# Altium PCB NB3000XN.PcbDoc (part 6 of 71)
Units mil, origin at the board's own origin, x right, y up, seen from the top; angles counter-clockwise.
Board outline 9527.56 x 6929.77 mil, 6 copper layers (Top Layer, GND+SHIELD, MidLayer1, MidLayer2, P2 - 3V3+5V0, Bottom Layer), stack 62.375 mil thick; 832 components, 1027 nets, 4655 pads, 4981 vias.
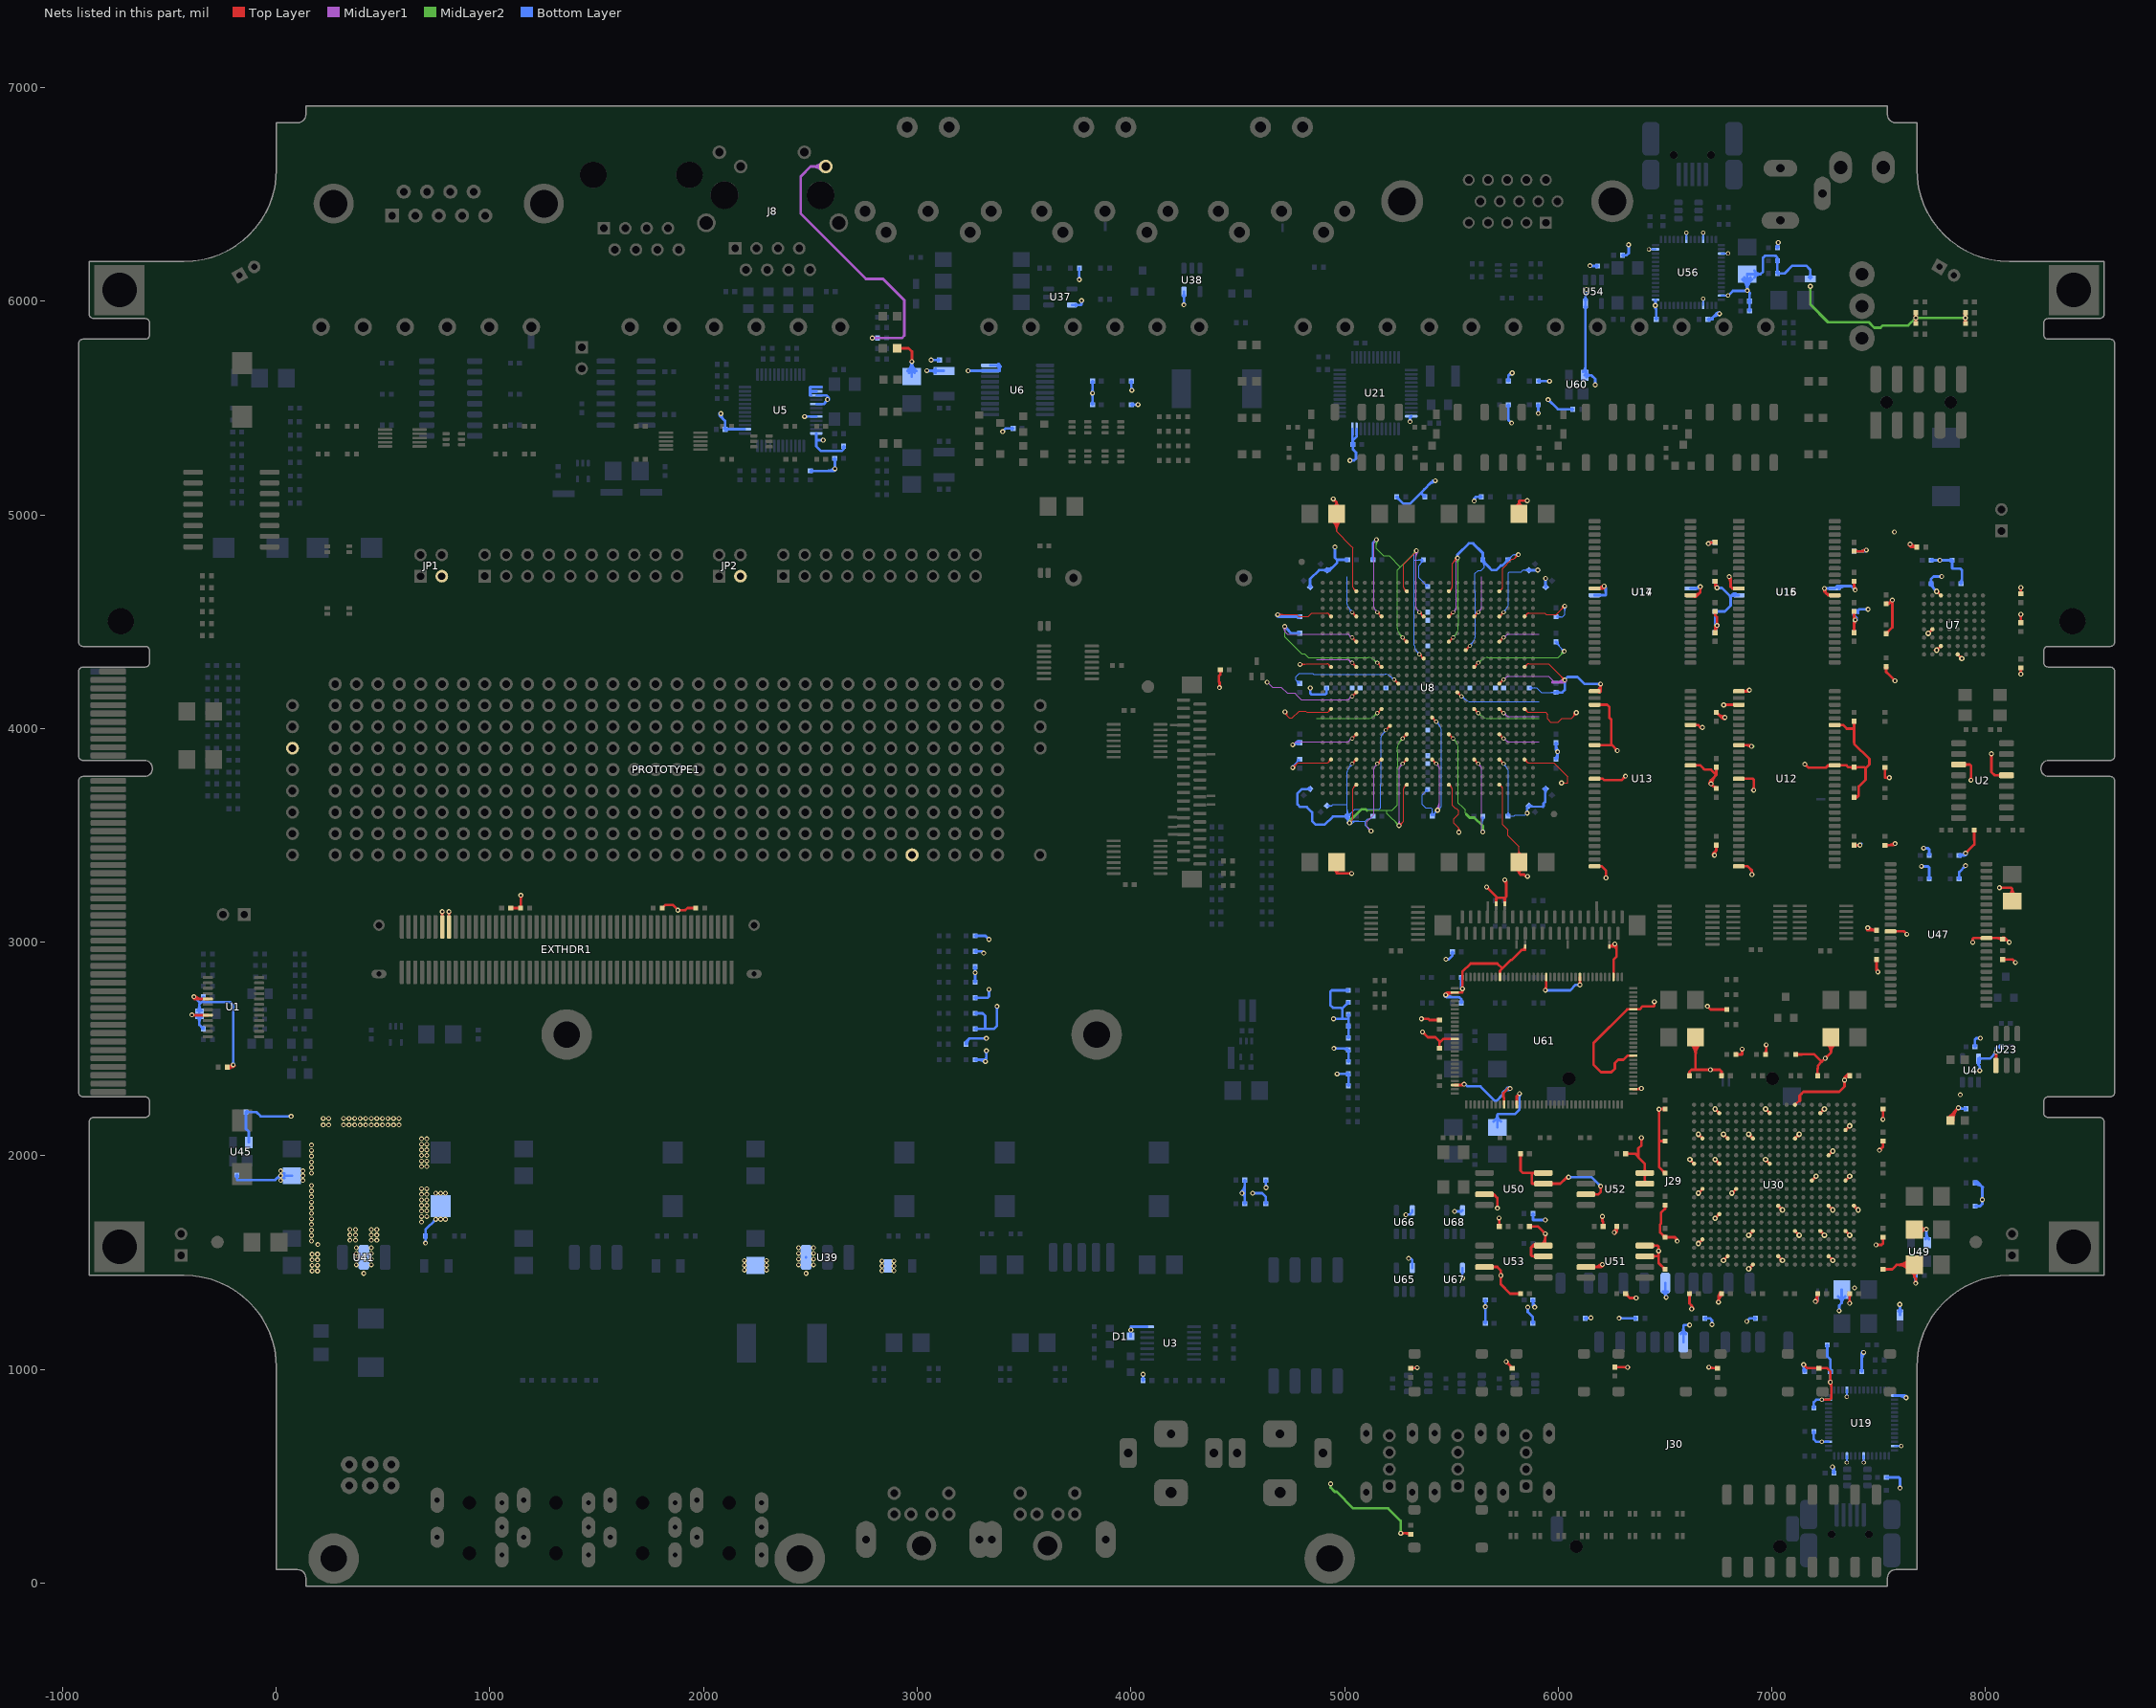
[diagram p10: the nets of this part, all layers, seen from the top]

## Via types
v1: diameter 23, hole 11.81, Top Layer to Bottom Layer, 3672 vias
v2: diameter 26, hole 11.81, Top Layer to Bottom Layer, 461 vias
v3: diameter 19, hole 11.81, Top Layer to Bottom Layer, tented both sides, 396 vias
v4: diameter 23.62, hole 11.81, Top Layer to Bottom Layer, 288 vias
v5: diameter 20, hole 11.81, Top Layer to Bottom Layer, 91 vias
v6: diameter 23, hole 11.81, Top Layer to Bottom Layer, tented both sides, 50 vias
v7: diameter 31, hole 11.81, Top Layer to Bottom Layer, 15 vias
v8: diameter 27.56, hole 11.81, Top Layer to Bottom Layer, tented both sides, 4 vias
v9: diameter 29, hole 11.81, Top Layer to Bottom Layer, 3 vias
v10: diameter 21, hole 11.81, Top Layer to Bottom Layer, 1 vias

## Nets (pads, with @x,y where several pads share a name; then routed paths per layer and width w, separated by ;. In a path a pad name is that pad's centre, name@x,y a point inside that pad or via, vN(x,y) a via of type N, cw(c..) or ccw(c..) an arc to the next point about the centre after c; other vN are vias at no path point) (continued)
3V3: C20.1 C21.1 C35.1 C36.1 C37.2 C39.2 C49.1 C50.2 C51.2 C52.2 C54.2 C55.1 C56.1 C57.1 C58.1 C59.1 C60.1 C63.1 C64.1 C65.1 C66.1 C67.1 C68.1 C69.1 C70.1 C71.1 C72.1 C73.1 C74.1 C75.1 C76.1 C77.1 C78.1 C79.1 C80.1 C81.1 C82.1 C83.1 C84.1 C85.1 C86.1 C90.2 C91.2 C92.2 C93.1 C94.1 C95.1 C96.1 C126.1 C127.1 C136.1 C137.1 C153.1 C154.1 C155.1 C156.1 C158.1 C159.2 C160.1 C161.2 C162.1 C163.2 C164.1 C165.2 C168.1 C172.2 C173.2 C174.2 C175.1 C176.1 C177.1 C185.1 C200.1 C201.1 C202.1 C203.1 C215.1 C216.1 C217.1 C218.1 C219.1 C220.1 C221.1 C222.1 C223.1 C224.1 C225.1 C226.1 C227.1 C228.1 C229.1 C231.1 C232.1 C233.1 C234.1 C235.1 C236.1 C237.1 C238.1 C239.1 C240.1 C241.1 C242.1 C243.1 C244.1 C245.1 C246.1 C247.1 C248.1 C249.1 C250.1 C251.1 C252.1 C253.1 C254.1 C255.1 C256.1 C257.1 C258.1 C259.1 C276.1 C277.1 C278.1 C279.1 C291.1 C292.1 C293.1 C294.1 C295.1 C296.1 C297.1 C298.1 C299.1 C300.1 C301.1 C302.1 C303.1 C304.1 C305.1 C307.1 C308.1 C309.1 C310.1 C311.1 C312.1 C313.1 C314.1 C315.1 C316.1 C317.1 C318.1 C319.1 C320.1 C321.1 C322.1 C323.1 C324.1 C325.1 C326.1 C327.1 C328.1 C329.1 C330.1 C331.1 C332.1 C333.1 C334.1 C335.1 D1.3 EXTHDR1.85 EXTHDR1.87 J8.12 J29.4 J30.4 JP1.3 JP2.3 L2.1 LED2.1 LED3.1 NT6.2 NT10.1 NT34.2 NT35.2 NT36.2 NT37.2 NT45.1 PROTOTYPE1.28 R21.1 R39.1 R50.2 R57.2 R59.2 R70.2 R73.2 R76.2 R77.2 R98.2 R99.2 R102.1 R103.1 R104.2 R105.1 R106.2 R107.1 R113.1 R114.1 R115.2 R131.2 R147.1 R154.2 R156.2 R158.2 R159.2 R161.1 R162.1 R195.2 R205.2 R215.1 R216.2 R217.2 R218.2 R219.2 R224.2 R225.2 R226.2 R227.2 R232.2 R234.2 R235.2 R236.2 R237.2 R238.2 R239.2 R240.2 R241.2 R242.2 R243.2 R248.2 R250.1 R251.1 R252.2 R253.1 R254.1 R255.1 R256.1 R260.2 R264.2 R265.2 R266.2 R271.2 R272.2 R273.2 R277.1 R278.2 R279.1 R280.1 R281.1 R282.1 R283.1 TP4.1 U1.5 U1.8 U2.3 U2.13 U3.14 U4.5 U5.14 U5.37 U5.38 U5.39 U5.41 U5.44 U5.48 U6.19 U6.20 U7.D8 U7.F1 U7.F7 U7.G5 U8.AB2 U8.AB5 U8.AB8 U8.AB11 U8.AB14 U8.AB19 U8.AB22 U8.AB25 U8.AE5 U8.AE11 U8.AE16 U8.AE22 U8.B5 U8.B11 U8.B16 U8.B22 U8.E2 U8.E5 U8.E8 U8.E13 U8.E16 U8.E19 U8.E22 U8.E25 U8.H5 U8.H11 U8.H16 U8.H22 U8.J18 U8.K13 U8.L2 U8.L5 U8.L8 U8.L19 U8.L25 U8.N10 U8.N22 U8.P5 U8.P17 U8.T2 U8.T8 U8.T19 U8.T22 U8.T25 U8.U14 U8.V9 U8.W5 U8.W11 U8.W16 U8.W22 U12.1 U12.3 U12.9 U12.14 U12.27 U12.43 U12.49 U13.1 U13.3 U13.9 U13.14 U13.27 U13.43 U13.49 U14.11 U14.33 U15.11 U15.33 U16.11 U16.33 U17.11 U17.33 U19.7 U19.11 U19.17 U19.27 U19.32 U19.43 U19.55 U21.12 U21.23 U21.24 U23.4 U30.A13 U30.B4 U30.B10 U30.B16 U30.D7 U30.D13 U30.D19 U30.E2 U30.E16 U30.F10 U30.H1 U30.H5 U30.H16 U30.K13 U30.K19 U30.L2 U30.L8 U30.N5 U30.N16 U30.N20 U30.R11 U30.T5 U30.T19 U30.U2 U30.U8 U30.U14 U30.W5 U30.W11 U30.W17 U30.Y8 U37.5 U38.5 U39.3 U41.2 U45.4 U47.11 U47.33 U49.4 U50.3 U50.7 U50.8 U51.3 U51.7 U51.8 U52.3 U52.7 U52.8 U53.3 U53.7 U53.8 U54.5 U56.7 U56.11 U56.17 U56.27 U56.32 U56.43 U56.55 U60.4 U61.10 U61.13 U61.40 U61.48 U61.59 U61.67 U61.75 U61.83 U61.94 U61.104 U61.115 U61.126 U65.5 U66.5 U67.5 U68.5 | length 76783.8
  Top Layer w4: R147.1@4415.19,4271.37 R147.1@4418.82,4275 ; v1(4686.86,4533.37) 4757,4533.37 4776.66,4533.37 4784.33,4525.71 4802.13,4525.71 4824,4525.71 4831.86,4525.71 4842.52,4536.37 4842.52,4536.49 4846.19,4540.15 4855.26,4540.15 4860,4540.15 4870,4540.15 4917.53,4540.15 ; v1@4690.75,4529.49 cw(c4700.14,4520.1) 4700.14,4533.37 cw(c4700.14,4546.65) v1@4690.75,4537.26 ; v1@4693.57,4526.66 cw(c4709.79,4510.44) 4709.79,4533.37 cw(c4709.79,4556.31) v1@4693.57,4540.09 ; v4(4721.3,4078.1) 4725,4074.4 4725,4065 4740.79,4049.21 4755.77,4049.21 4788.77,4082.21 4817.42,4082.21 4823.56,4076.07 4860,4076.07 4870,4076.07 4917.53,4076.07 ccw(c4917.53,4086.22) 4924.71,4079.04 ; v4@4723.03,4077.58 ccw(c4736.72,4073.49) 4726.62,4063.38 ; v4@4726.86,4076.44 ccw(c4744.01,4071.3) 4731.35,4058.65 ; v4@4730.7,4075.29 ccw(c4751.3,4069.12) 4736.09,4053.91 ; v1(4757.52,3816.71) 4780.66,3839.85 4860,3839.85 4870,3839.85 4917.53,3839.85 ; v1@4757.52,3822.21 ccw(c4757.52,3835.49) 4766.91,3826.1 ccw(c4776.3,3816.71) v1@4763.02,3816.71 ; v1@4757.52,3826.21 ccw(c4757.52,3849.14) 4773.74,3832.93 ccw(c4789.96,3816.71) v1@4767.02,3816.71 ; v1@4795.41,4296.15 cw(c4804.8,4286.76) 4804.8,4300.04 cw(c4804.8,4313.32) 4795.41,4303.93 v1(4791.52,4300.04) 4816.11,4300.04 4820,4303.93 4860,4303.93 4870,4303.93 4917.53,4303.93 cw(c4917.53,4293.78) 4924.71,4300.96 ; v1@4798.24,4293.32 cw(c4814.46,4277.11) 4814.46,4300.04 cw(c4814.46,4322.98) v1@4798.24,4306.76 ; U8.T2@4929.9,4091.57 cw(c4912.17,4091.57) 4924.71,4079.04 ; U8.L2@4929.9,4288.43 ccw(c4912.17,4288.43) 4924.71,4300.96 ; U8.T2@4937.24,4084.23 ccw(c4937.24,4066.51) 4924.71,4079.04 ; U8.L2@4937.24,4295.77 cw(c4937.24,4313.49) 4924.71,4300.96 ; C276.1@4939.62,4971.9 cw(c4900.61,4923.22) 4962.99,4923.22 ; C276.1@4942.12,4975.02 cw(c4907.29,4931.56) 4962.99,4931.56 cw(c5018.7,4931.56) C276.1@4983.86,4975.02 ; C276.1@4944.63,4978.14 cw(c4913.97,4939.89) 4962.99,4939.89 cw(c5012.02,4939.89) C276.1@4981.36,4978.14 ; C276.1@4947.13,4981.27 cw(c4920.64,4948.22) 4962.99,4948.22 cw(c5005.34,4948.22) C276.1@4978.86,4981.27 ; C276.1@4949.63,4984.39 cw(c4927.32,4956.55) 4962.99,4956.55 cw(c4998.66,4956.55) C276.1@4976.36,4984.39 ; C276.1@4962.99,4982.01 4962.99,4923.22 ; C276.1@4986.36,4971.9 ccw(c5025.37,4923.22) 4962.99,4923.22 ; v1(5023.52,3558.37) 5039.85,3574.7 5039.85,3655.26 5039.85,3660 5039.85,3670 5039.85,3717.53 ; v3(5035.67,3835.67) U8.AB5@5055.35,3855.35 ; v3(5035.67,3953.78) U8.W5@5055.35,3973.46 ; v3(5035.67,4150.63) U8.P5@5055.35,4170.31 ; v3(5035.67,4308.11) U8.L5@5055.35,4288.43 ; v3(5035.67,4426.22) U8.H5@5055.35,4406.54 ; v3(5035.67,4544.33) U8.E5@5055.35,4524.65 ; U8.AB5@5047.85,3855.35 cw(c5029.75,3855.35) 5042.55,3842.55 cw(c5055.35,3829.75) U8.AB5@5055.35,3847.85 ; U8.W5@5047.85,3973.46 cw(c5029.75,3973.46) 5042.55,3960.66 cw(c5055.35,3947.86) U8.W5@5055.35,3965.96 ; U8.P5@5047.85,4170.31 cw(c5029.75,4170.31) 5042.55,4157.51 cw(c5055.35,4144.71) U8.P5@5055.35,4162.81 ; U8.L5@5047.85,4288.43 ccw(c5029.75,4288.43) 5042.55,4301.23 ccw(c5055.35,4314.03) U8.L5@5055.35,4295.93 ; U8.H5@5047.85,4406.54 ccw(c5029.75,4406.54) 5042.55,4419.34 ccw(c5055.35,4432.14) U8.H5@5055.35,4414.04 ; U8.E5@5047.85,4524.65 ccw(c5029.75,4524.65) 5042.55,4537.45 ccw(c5055.35,4550.25) U8.E5@5055.35,4532.15 ; U8.AB5@5048.01,3855.35 cw(c5030.29,3855.35) 5042.82,3842.82 cw(c5055.35,3830.29) U8.AB5@5055.35,3848.01 ; U8.W5@5048.01,3973.46 cw(c5030.29,3973.46) 5042.82,3960.93 cw(c5055.35,3948.4) U8.W5@5055.35,3966.12 ; U8.P5@5048.01,4170.31 cw(c5030.29,4170.31) 5042.82,4157.78 cw(c5055.35,4145.25) U8.P5@5055.35,4162.97 ; U8.L5@5048.01,4288.43 ccw(c5030.29,4288.43) 5042.82,4300.96 ccw(c5055.35,4313.49) U8.L5@5055.35,4295.77 ; U8.H5@5048.01,4406.54 ccw(c5030.29,4406.54) 5042.82,4419.07 ccw(c5055.35,4431.6) U8.H5@5055.35,4413.88 ; U8.E5@5048.01,4524.65 ccw(c5030.29,4524.65) 5042.82,4537.18 ccw(c5055.35,4549.71) U8.E5@5055.35,4531.99 ; v3(5153.78,3835.67) U8.AB8@5173.46,3855.35 ; v3(5153.78,4071.89) U8.T8@5173.46,4091.57 ; v3(5153.78,4308.11) U8.L8@5173.46,4288.43 ; v3(5153.78,4544.33) U8.E8@5173.46,4524.65 ; U8.AB8@5165.96,3855.35 cw(c5147.86,3855.35) 5160.66,3842.55 cw(c5173.46,3829.75) U8.AB8@5173.46,3847.85 ; U8.T8@5165.96,4091.57 cw(c5147.86,4091.57) 5160.66,4078.77 cw(c5173.46,4065.97) U8.T8@5173.46,4084.07 ; U8.L8@5165.96,4288.43 ccw(c5147.86,4288.43) 5160.66,4301.23 ccw(c5173.46,4314.03) U8.L8@5173.46,4295.93 ; U8.E8@5165.96,4524.65 ccw(c5147.86,4524.65) 5160.66,4537.45 ccw(c5173.46,4550.25) U8.E8@5173.46,4532.15 ; U8.AB8@5166.12,3855.35 cw(c5148.4,3855.35) 5160.93,3842.82 cw(c5173.46,3830.29) U8.AB8@5173.46,3848.01 ; U8.T8@5166.12,4091.57 cw(c5148.4,4091.57) 5160.93,4079.04 cw(c5173.46,4066.51) U8.T8@5173.46,4084.23 ; U8.L8@5166.12,4288.43 ccw(c5148.4,4288.43) 5160.93,4300.96 ccw(c5173.46,4313.49) U8.L8@5173.46,4295.77 ; U8.E8@5166.12,4524.65 ccw(c5148.4,4524.65) 5160.93,4537.18 ccw(c5173.46,4549.71) U8.E8@5173.46,4531.99 ; v3(5193.15,3993.15) U8.V9@5212.83,4012.83 ; U8.V9@5205.33,4012.83 cw(c5187.23,4012.83) 5200.03,4000.03 cw(c5212.83,3987.23) U8.V9@5212.83,4005.33 ; U8.V9@5205.49,4012.83 cw(c5187.77,4012.83) 5200.3,4000.3 cw(c5212.83,3987.77) U8.V9@5212.83,4005.49 ; v3(5232.52,4229.37) U8.N10@5252.2,4209.69 ; U8.N10@5244.7,4209.69 ccw(c5226.6,4209.69) 5239.4,4222.49 ccw(c5252.2,4235.29) U8.N10@5252.2,4217.19 ; U8.N10@5244.86,4209.69 ccw(c5227.14,4209.69) 5239.67,4222.22 ccw(c5252.2,4234.75) U8.N10@5252.2,4217.03 ; v1(5255.52,3545.37) 5276.07,3565.92 5276.07,3660 ; v1@5255.52,3550.87 ccw(c5255.52,3564.15) 5264.91,3554.76 ccw(c5274.3,3545.37) v1@5261.02,3545.37 ; v1@5255.52,3554.87 ccw(c5255.52,3577.81) 5271.74,3561.59 ccw(c5287.96,3545.37) v1@5265.02,3545.37 ; v3(5271.89,3835.67) U8.AB11@5291.57,3855.35 ; v3(5271.89,3953.78) U8.W11@5291.57,3973.46 ; v3(5271.89,4426.22) U8.H11@5291.57,4406.54 ; 5276.07,3658.37 5276.07,3655.26 5276.07,3660 ; U8.AB11@5284.07,3855.35 cw(c5265.97,3855.35) 5278.77,3842.55 cw(c5291.57,3829.75) U8.AB11@5291.57,3847.85 ; U8.W11@5284.07,3973.46 cw(c5265.97,3973.46) 5278.77,3960.66 cw(c5291.57,3947.86) U8.W11@5291.57,3965.96 ; U8.H11@5284.07,4406.54 ccw(c5265.97,4406.54) 5278.77,4419.34 ccw(c5291.57,4432.14) U8.H11@5291.57,4414.04 ; U8.AE11@5284.23,3737.24 cw(c5266.51,3737.24) 5279.04,3724.71 ; U8.AB11@5284.23,3855.35 cw(c5266.51,3855.35) 5279.04,3842.82 cw(c5291.57,3830.29) U8.AB11@5291.57,3848.01 ; U8.W11@5284.23,3973.46 cw(c5266.51,3973.46) 5279.04,3960.93 cw(c5291.57,3948.4) U8.W11@5291.57,3966.12 ; U8.H11@5284.23,4406.54 ccw(c5266.51,4406.54) 5279.04,4419.07 ccw(c5291.57,4431.6) U8.H11@5291.57,4413.88 ; U8.B11@5284.23,4642.76 ccw(c5266.51,4642.76) 5279.04,4655.29 ; U8.AE11@5291.57,3729.9 ccw(c5291.57,3712.17) 5279.04,3724.71 ; U8.B11@5291.57,4650.1 cw(c5291.57,4667.83) 5279.04,4655.29 ; 5306.86,4800.65 5276.07,4769.86 5276.07,4724.74 5276.07,4720 5276.07,4710 5276.07,4662.47 ccw(c5286.22,4662.47) 5279.04,4655.29 ; 5306.86,4800.71 5339.52,4833.37 5337.54,4833.37 v1(5336.67,4832.5) ; v3(5350.63,4347.48) U8.K13@5370.31,4327.8 ; v3(5350.63,4544.33) U8.E13@5370.31,4524.65 ; U8.K13@5362.81,4327.8 ccw(c5344.71,4327.8) 5357.51,4340.6 ccw(c5370.31,4353.4) U8.K13@5370.31,4335.3 ; U8.E13@5362.81,4524.65 ccw(c5344.71,4524.65) 5357.51,4537.45 ccw(c5370.31,4550.25) U8.E13@5370.31,4532.15 ; U8.K13@5362.97,4327.8 ccw(c5345.25,4327.8) 5357.78,4340.33 ccw(c5370.31,4352.86) U8.K13@5370.31,4335.14 ; U8.E13@5362.97,4524.65 ccw(c5345.25,4524.65) 5357.78,4537.18 ccw(c5370.31,4549.71) U8.E13@5370.31,4531.99 ; U8.AB14@5409.69,3847.85 cw(c5409.69,3829.75) 5422.49,3842.55 cw(c5435.29,3855.35) U8.AB14@5417.19,3855.35 ; U8.AB14@5409.69,3848.01 cw(c5409.69,3830.29) 5422.22,3842.82 cw(c5434.75,3855.35) U8.AB14@5417.03,3855.35 ; U8.AB14@5409.69,3855.35 v3(5429.37,3835.67) ; U8.U14@5409.69,4044.7 cw(c5409.69,4026.6) 5422.49,4039.4 cw(c5435.29,4052.2) U8.U14@5417.19,4052.2 ; U8.U14@5409.69,4044.86 cw(c5409.69,4027.14) 5422.22,4039.67 cw(c5434.75,4052.2) U8.U14@5417.03,4052.2 ; U8.U14@5409.69,4052.2 v3(5429.37,4032.52) ; U8.AE16@5488.43,3729.9 cw(c5488.43,3712.17) 5500.96,3724.71 ; U8.W16@5488.43,3965.96 cw(c5488.43,3947.86) 5501.23,3960.66 cw(c5514.03,3973.46) U8.W16@5495.93,3973.46 ; U8.W16@5488.43,3966.12 cw(c5488.43,3948.4) 5500.96,3960.93 cw(c5513.49,3973.46) U8.W16@5495.77,3973.46 ; U8.W16@5488.43,3973.46 v3(5508.11,3953.78) ; U8.H16@5488.43,4406.54 v3(5508.11,4426.22) ; U8.H16@5488.43,4413.88 ccw(c5488.43,4431.6) 5500.96,4419.07 ccw(c5513.49,4406.54) U8.H16@5495.77,4406.54 ; U8.H16@5488.43,4414.04 ccw(c5488.43,4432.14) 5501.23,4419.34 ccw(c5514.03,4406.54) U8.H16@5495.93,4406.54 ; U8.E16@5488.43,4524.65 v3(5508.11,4544.33) ; U8.E16@5488.43,4531.99 ccw(c5488.43,4549.71) 5500.96,4537.18 ccw(c5513.49,4524.65) U8.E16@5495.77,4524.65 ; U8.E16@5488.43,4532.15 ccw(c5488.43,4550.25) 5501.23,4537.45 ccw(c5514.03,4524.65) U8.E16@5495.93,4524.65 ; U8.B16@5488.43,4650.1 ccw(c5488.43,4667.83) 5500.96,4655.29 ; U8.AE16@5495.77,3737.24 ccw(c5513.49,3737.24) 5500.96,3724.71 ; U8.B16@5495.77,4642.76 cw(c5513.49,4642.76) 5500.96,4655.29 ; v1@5519.36,4798.37 cw(c5496.42,4798.37) 5512.64,4782.16 cw(c5528.86,4765.94) v1@5528.86,4788.87 ; v1@5523.36,4798.37 cw(c5510.08,4798.37) 5519.47,4788.99 cw(c5528.86,4779.6) v1@5528.86,4792.87 ; U8.P17@5527.8,4162.81 cw(c5527.8,4144.71) 5540.6,4157.51 cw(c5553.4,4170.31) U8.P17@5535.3,4170.31 ; U8.P17@5527.8,4162.97 cw(c5527.8,4145.25) 5540.33,4157.78 cw(c5552.86,4170.31) U8.P17@5535.14,4170.31 ; U8.P17@5527.8,4170.31 v3(5547.48,4150.63) ; v1(5528.86,4798.37) 5503.93,4773.45 5503.93,4724.74 5503.93,4720 5503.93,4710 5503.93,4662.47 cw(c5493.78,4662.47) 5500.96,4655.29 ; v4@5529,3522.76 ccw(c5519.52,3535) 5535,3535 ccw(c5550.48,3535) v4@5541,3522.76 ; v4@5531.44,3519.6 ccw(c5525.83,3526.85) 5535,3526.85 ccw(c5544.17,3526.85) v4@5538.56,3519.6 ; v4(5535,3515) 5535,3535 5512.5,3557.5 5512.5,3576.7 5535.17,3599.37 5535.17,3614.58 5522.25,3627.5 5517.5,3627.5 5503.93,3641.07 5503.93,3660 5503.93,3670 5503.93,3717.53 ccw(c5493.78,3717.53) 5500.96,3724.71 ; U8.J18@5567.17,4367.17 v3(5586.85,4386.85) ; U8.J18@5567.17,4374.51 ccw(c5567.17,4392.23) 5579.7,4379.7 ccw(c5592.23,4367.17) U8.J18@5574.51,4367.17 ; U8.J18@5567.17,4374.67 ccw(c5567.17,4392.77) 5579.97,4379.97 ccw(c5592.77,4367.17) U8.J18@5574.67,4367.17 ; U8.AB19@5606.54,3847.85 cw(c5606.54,3829.75) 5619.34,3842.55 cw(c5632.14,3855.35) U8.AB19@5614.04,3855.35 ; U8.AB19@5606.54,3848.01 cw(c5606.54,3830.29) 5619.07,3842.82 cw(c5631.6,3855.35) U8.AB19@5613.88,3855.35 ; U8.AB19@5606.54,3855.35 v3(5626.22,3835.67) ; U8.T19@5606.54,4084.07 cw(c5606.54,4065.97) 5619.34,4078.77 cw(c5632.14,4091.57) U8.T19@5614.04,4091.57 ; U8.T19@5606.54,4084.23 cw(c5606.54,4066.51) 5619.07,4079.04 cw(c5631.6,4091.57) U8.T19@5613.88,4091.57 ; U8.T19@5606.54,4091.57 v3(5626.22,4071.89) ; U8.L19@5606.54,4288.43 v3(5626.22,4308.11) ; U8.L19@5606.54,4295.77 ccw(c5606.54,4313.49) 5619.07,4300.96 ccw(c5631.6,4288.43) U8.L19@5613.88,4288.43 ; U8.L19@5606.54,4295.93 ccw(c5606.54,4314.03) 5619.34,4301.23 ccw(c5632.14,4288.43) U8.L19@5614.04,4288.43 ; U8.E19@5606.54,4524.65 v3(5626.22,4544.33) ; U8.E19@5606.54,4531.99 ccw(c5606.54,4549.71) 5619.07,4537.18 ccw(c5631.6,4524.65) U8.E19@5613.88,4524.65 ; U8.E19@5606.54,4532.15 ccw(c5606.54,4550.25) 5619.34,4537.45 ccw(c5632.14,4524.65) U8.E19@5614.04,4524.65 ; U8.AB22@5724.65,3847.85 cw(c5724.65,3829.75) 5737.45,3842.55 cw(c5750.25,3855.35) U8.AB22@5732.15,3855.35 ; U8.AB22@5724.65,3848.01 cw(c5724.65,3830.29) 5737.18,3842.82 cw(c5749.71,3855.35) U8.AB22@5731.99,3855.35 ; U8.AB22@5724.65,3855.35 v3(5744.33,3835.67) ; U8.W22@5724.65,3965.96 cw(c5724.65,3947.86) 5737.45,3960.66 cw(c5750.25,3973.46) U8.W22@5732.15,3973.46 ; U8.W22@5724.65,3966.12 cw(c5724.65,3948.4) 5737.18,3960.93 cw(c5749.71,3973.46) U8.W22@5731.99,3973.46 ; U8.W22@5724.65,3973.46 v3(5744.33,3953.78) ; U8.T22@5724.65,4084.07 cw(c5724.65,4065.97) 5737.45,4078.77 cw(c5750.25,4091.57) U8.T22@5732.15,4091.57 ; U8.T22@5724.65,4084.23 cw(c5724.65,4066.51) 5737.18,4079.04 cw(c5749.71,4091.57) U8.T22@5731.99,4091.57 ; U8.T22@5724.65,4091.57 v3(5744.33,4071.89) ; U8.N22@5724.65,4209.69 v3(5744.33,4229.37) ; U8.N22@5724.65,4217.03 ccw(c5724.65,4234.75) 5737.18,4222.22 ccw(c5749.71,4209.69) U8.N22@5731.99,4209.69 ; U8.N22@5724.65,4217.19 ccw(c5724.65,4235.29) 5737.45,4222.49 ccw(c5750.25,4209.69) U8.N22@5732.15,4209.69 ; U8.H22@5724.65,4406.54 v3(5744.33,4426.22) ; U8.H22@5724.65,4413.88 ccw(c5724.65,4431.6) 5737.18,4419.07 ccw(c5749.71,4406.54) U8.H22@5731.99,4406.54 ; U8.H22@5724.65,4414.04 ccw(c5724.65,4432.14) 5737.45,4419.34 ccw(c5750.25,4406.54) U8.H22@5732.15,4406.54 ; U8.E22@5724.65,4524.65 v3(5744.33,4544.33) ; U8.E22@5724.65,4531.99 ccw(c5724.65,4549.71) 5737.18,4537.18 ccw(c5749.71,4524.65) U8.E22@5731.99,4524.65 ; U8.E22@5724.65,4532.15 ccw(c5724.65,4550.25) 5737.45,4537.45 ccw(c5750.25,4524.65) U8.E22@5732.15,4524.65 ; 5748.52,3541.71 5749.11,3541.12 ; v1@5804.02,4814.37 cw(c5781.09,4814.37) 5797.31,4798.16 cw(c5813.52,4781.94) v1@5813.52,4804.87 ; v1@5808.02,4814.37 cw(c5794.75,4814.37) 5804.14,4804.99 cw(c5813.52,4795.6) v1@5813.52,4808.87 ; C279.1@5809.31,3415.5 ccw(c5807.31,3425) 5817.01,3425 ccw(c5826.71,3425) C279.1@5824.71,3415.5 ; C279.1@5810.13,3411.59 ccw(c5808.34,3420.07) 5817.01,3420.07 ccw(c5825.67,3420.07) C279.1@5823.89,3411.59 ; v1(5813.52,4814.37) 5792.16,4793.01 5783.76,4793.01 5740.15,4749.4 5740.15,4737.37 5740.15,4735 5740.15,4724.74 5740.15,4720 5740.15,4710 5740.15,4662.47 ; C279.1@5817.01,3375 5817.01,3447.22 5765.19,3499.04 5765.19,3525.04 5749.11,3541.12 ; U8.T25@5842.76,4084.23 cw(c5842.76,4066.51) 5855.29,4079.04 ; U8.L25@5842.76,4295.77 ccw(c5842.76,4313.49) 5855.29,4300.96 ; v1@5848.52,3308.37 v1(5856.86,3308.37) ; U8.T25@5850.1,4091.57 ccw(c5867.83,4091.57) 5855.29,4079.04 ; U8.L25@5850.1,4288.43 cw(c5867.83,4288.43) 5855.29,4300.96 ; v4(6015,3745) 6015.87,3745.87 6045.19,3745.87 6045.19,3774.1 5979.44,3839.85 5920,3839.85 5910,3839.85 5862.47,3839.85 ; v1@6021.02,4227.71 ccw(c5998.09,4227.71) 6014.31,4243.93 ccw(c6030.52,4260.14) v1@6030.52,4237.21 ; v1@6021.02,4573.71 cw(c5998.09,4573.71) 6014.31,4557.49 cw(c6030.52,4541.27) v1@6030.52,4564.21 ; v1@6025.02,4227.71 ccw(c6011.75,4227.71) 6021.14,4237.1 ccw(c6030.52,4246.49) v1@6030.52,4233.21 ; v1@6025.02,4573.71 cw(c6011.75,4573.71) 6021.13,4564.32 cw(c6030.52,4554.93) v1@6030.52,4568.21 ; v1(6030.52,4227.71) 5958.19,4300.04 5954.3,4303.93 5931.86,4303.93 5920,4303.93 5910,4303.93 5862.47,4303.93 ccw(c5862.47,4293.78) 5855.29,4300.96 ; v1(6030.52,4573.71) 5990.19,4533.37 5945,4533.37 5938.22,4540.15 5923.52,4540.15 ; 6065,4050 ccw(c6040.4,4074.6) v4@6075.19,4074.91 ; 6071.74,4056.74 ccw(c6053.77,4074.72) v4@6079.19,4074.95 ; 6076.79,4061.79 cw(c6085,4053.57) v4@6085,4065.19 ; 6078.49,4063.49 ccw(c6067.13,4074.84) v4@6083.19,4074.98 ; v4(6085,4075) 6085,4070 6062.5,4047.5 6017,4047.5 5999.5,4030 5965,4030 5950.36,4044.64 5950.36,4066.53 5940.82,4076.07 5920,4076.07 5910,4076.07 5862.47,4076.07 cw(c5862.47,4086.22) 5855.29,4079.04 ; 4917.53,3839.85 ccw(c4917.53,3850) 4924.71,3842.82 ; 4917.53,3839.85 ccw(c4917.53,3850) 4924.71,3842.82 ; 4917.53,4540.15 cw(c4917.53,4530) 4924.71,4537.18 ; 4917.53,4540.15 cw(c4917.53,4530) 4924.71,4537.18 ; 4924.71,3842.82 ccw(c4912.17,3855.35) 4929.9,3855.35 cw(c4912.17,3855.35) 4924.71,3842.82 ; 4924.71,3842.82 cw(c4937.24,3830.29) 4937.24,3848.01 ccw(c4937.24,3830.29) 4924.71,3842.82 ; 4924.71,4537.18 cw(c4912.17,4524.65) 4929.9,4524.65 ccw(c4912.17,4524.65) 4924.71,4537.18 ; 4924.71,4537.18 ccw(c4937.24,4549.71) 4937.24,4531.99 cw(c4937.24,4549.71) 4924.71,4537.18 ; 4962.99,4923.22 5026.84,4859.37 5028.96,4857.25 ; 5028.96,4857.25 5031.25,4854.96 5039.85,4846.37 ; 5028.96,4857.25 5039.85,4846.37 ; 5039.85,3717.53 cw(c5050,3717.53) 5042.82,3724.71 ; 5039.85,3717.53 cw(c5050,3717.53) 5042.82,3724.71 ; 5039.85,4662.47 ccw(c5050,4662.47) 5042.82,4655.29 ; 5039.85,4662.47 ccw(c5050,4662.47) 5042.82,4655.29 ; 5039.85,4662.47 5039.85,4710 5039.85,4720 5039.85,4724.74 5039.85,4768 5039.85,4775.15 5039.85,4846.37 ; 5042.82,3724.71 cw(c5055.35,3712.17) 5055.35,3729.9 ccw(c5055.35,3712.17) 5042.82,3724.71 ; 5042.82,3724.71 ccw(c5030.29,3737.24) 5048.01,3737.24 cw(c5030.29,3737.24) 5042.82,3724.71 ; 5042.82,4655.29 ccw(c5055.35,4667.83) 5055.35,4650.1 cw(c5055.35,4667.83) 5042.82,4655.29 ; 5042.82,4655.29 cw(c5030.29,4642.76) 5048.01,4642.76 ccw(c5030.29,4642.76) 5042.82,4655.29 ; 5048.47,3848.47 cw(c5035.67,3861.28) 5035.67,3843.17 ccw(c5035.67,3861.28) 5048.47,3848.47 ; 5048.47,3848.47 ccw(c5061.28,3835.67) 5043.17,3835.67 cw(c5061.28,3835.67) 5048.47,3848.47 ; 5048.47,3966.58 cw(c5035.67,3979.39) 5035.67,3961.28 ccw(c5035.67,3979.39) 5048.47,3966.58 ; 5048.47,3966.58 ccw(c5061.28,3953.78) 5043.17,3953.78 cw(c5061.28,3953.78) 5048.47,3966.58 ; 5048.47,4163.43 cw(c5035.67,4176.24) 5035.67,4158.13 ccw(c5035.67,4176.24) 5048.47,4163.43 ; 5048.47,4163.43 ccw(c5061.28,4150.63) 5043.17,4150.63 cw(c5061.28,4150.63) 5048.47,4163.43 ; 5048.47,4295.31 ccw(c5035.67,4282.5) 5035.67,4300.61 cw(c5035.67,4282.5) 5048.47,4295.31 ; 5048.47,4295.31 cw(c5061.28,4308.11) 5043.17,4308.11 ccw(c5061.28,4308.11) 5048.47,4295.31 ; 5048.47,4413.42 ccw(c5035.67,4400.61) 5035.67,4418.72 cw(c5035.67,4400.61) 5048.47,4413.42 ; 5048.47,4413.42 cw(c5061.28,4426.22) 5043.17,4426.22 ccw(c5061.28,4426.22) 5048.47,4413.42 ; 5048.47,4531.53 ccw(c5035.67,4518.72) 5035.67,4536.83 cw(c5035.67,4518.72) 5048.47,4531.53 ; 5048.47,4531.53 cw(c5061.28,4544.33) 5043.17,4544.33 ccw(c5061.28,4544.33) 5048.47,4531.53 ; 5166.58,3848.47 cw(c5153.78,3861.28) 5153.78,3843.17 ccw(c5153.78,3861.28) 5166.58,3848.47 ; 5166.58,3848.47 ccw(c5179.39,3835.67) 5161.28,3835.67 cw(c5179.39,3835.67) 5166.58,3848.47 ; 5166.58,4084.69 cw(c5153.78,4097.5) 5153.78,4079.39 ccw(c5153.78,4097.5) 5166.58,4084.69 ; 5166.58,4084.69 ccw(c5179.39,4071.89) 5161.28,4071.89 cw(c5179.39,4071.89) 5166.58,4084.69 ; 5166.58,4295.31 cw(c5179.39,4308.11) 5161.28,4308.11 ccw(c5179.39,4308.11) 5166.58,4295.31 ; 5166.58,4295.31 ccw(c5153.78,4282.5) 5153.78,4300.61 cw(c5153.78,4282.5) 5166.58,4295.31 ; 5166.58,4531.53 cw(c5179.39,4544.33) 5161.28,4544.33 ccw(c5179.39,4544.33) 5166.58,4531.53 ; 5166.58,4531.53 ccw(c5153.78,4518.72) 5153.78,4536.83 cw(c5153.78,4518.72) 5166.58,4531.53 ; 5205.95,4005.95 cw(c5193.15,4018.76) 5193.15,4000.65 ccw(c5193.15,4018.76) 5205.95,4005.95 ; 5205.95,4005.95 ccw(c5218.76,3993.15) 5200.65,3993.15 cw(c5218.76,3993.15) 5205.95,4005.95 ; 5245.32,4216.57 cw(c5258.13,4229.37) 5240.02,4229.37 ccw(c5258.13,4229.37) 5245.32,4216.57 ; 5245.32,4216.57 ccw(c5232.52,4203.76) 5232.52,4221.87 cw(c5232.52,4203.76) 5245.32,4216.57 ; 5276.07,3660 5276.07,3670 5276.07,3717.53 cw(c5286.22,3717.53) 5279.04,3724.71 ; 5284.69,3848.47 cw(c5271.89,3861.28) 5271.89,3843.17 ccw(c5271.89,3861.28) 5284.69,3848.47 ; 5284.69,3848.47 ccw(c5297.5,3835.67) 5279.39,3835.67 cw(c5297.5,3835.67) 5284.69,3848.47 ; 5284.69,3966.58 ccw(c5297.5,3953.78) 5279.39,3953.78 cw(c5297.5,3953.78) 5284.69,3966.58 ; 5284.69,3966.58 cw(c5271.89,3979.39) 5271.89,3961.28 ccw(c5271.89,3979.39) 5284.69,3966.58 ; 5284.69,4413.42 cw(c5297.5,4426.22) 5279.39,4426.22 ccw(c5297.5,4426.22) 5284.69,4413.42 ; 5284.69,4413.42 ccw(c5271.89,4400.61) 5271.89,4418.72 cw(c5271.89,4400.61) 5284.69,4413.42 ; 5363.43,4334.68 cw(c5376.24,4347.48) 5358.13,4347.48 ccw(c5376.24,4347.48) 5363.43,4334.68 ; 5363.43,4334.68 ccw(c5350.63,4321.87) 5350.63,4339.98 cw(c5350.63,4321.87) 5363.43,4334.68 ; 5363.43,4531.53 cw(c5376.24,4544.33) 5358.13,4544.33 ccw(c5376.24,4544.33) 5363.43,4531.53 ; 5363.43,4531.53 ccw(c5350.63,4518.72) 5350.63,4536.83 cw(c5350.63,4518.72) 5363.43,4531.53 ; 5416.57,3848.47 cw(c5403.76,3835.67) 5421.87,3835.67 ccw(c5403.76,3835.67) 5416.57,3848.47 ; 5416.57,3848.47 ccw(c5429.37,3861.28) 5429.37,3843.17 cw(c5429.37,3861.28) 5416.57,3848.47 ; 5416.57,4045.32 cw(c5403.76,4032.52) 5421.87,4032.52 ccw(c5403.76,4032.52) 5416.57,4045.32 ; 5416.57,4045.32 ccw(c5429.37,4058.13) 5429.37,4040.02 cw(c5429.37,4058.13) 5416.57,4045.32 ; 5495.31,3966.58 cw(c5482.5,3953.78) 5500.61,3953.78 ccw(c5482.5,3953.78) 5495.31,3966.58 ; 5495.31,3966.58 ccw(c5508.11,3979.39) 5508.11,3961.28 cw(c5508.11,3979.39) 5495.31,3966.58 ; 5495.31,4413.42 cw(c5508.11,4400.61) 5508.11,4418.72 ccw(c5508.11,4400.61) 5495.31,4413.42 ; 5495.31,4413.42 ccw(c5482.5,4426.22) 5500.61,4426.22 cw(c5482.5,4426.22) 5495.31,4413.42 ; 5495.31,4531.53 cw(c5508.11,4518.72) 5508.11,4536.83 ccw(c5508.11,4518.72) 5495.31,4531.53 ; 5495.31,4531.53 ccw(c5482.5,4544.33) 5500.61,4544.33 cw(c5482.5,4544.33) 5495.31,4531.53 ; 5534.68,4163.43 cw(c5521.87,4150.63) 5539.98,4150.63 ccw(c5521.87,4150.63) 5534.68,4163.43 ; 5534.68,4163.43 ccw(c5547.48,4176.24) 5547.48,4158.13 cw(c5547.48,4176.24) 5534.68,4163.43 ; 5574.05,4374.05 cw(c5586.85,4361.24) 5586.85,4379.35 ccw(c5586.85,4361.24) 5574.05,4374.05 ; 5574.05,4374.05 ccw(c5561.24,4386.85) 5579.35,4386.85 cw(c5561.24,4386.85) 5574.05,4374.05 ; 5613.42,3848.47 cw(c5600.61,3835.67) 5618.72,3835.67 ccw(c5600.61,3835.67) 5613.42,3848.47 ; 5613.42,3848.47 ccw(c5626.22,3861.28) 5626.22,3843.17 cw(c5626.22,3861.28) 5613.42,3848.47 ; 5613.42,4084.69 cw(c5600.61,4071.89) 5618.72,4071.89 ccw(c5600.61,4071.89) 5613.42,4084.69 ; 5613.42,4084.69 ccw(c5626.22,4097.5) 5626.22,4079.39 cw(c5626.22,4097.5) 5613.42,4084.69 ; 5613.42,4295.31 cw(c5626.22,4282.5) 5626.22,4300.61 ccw(c5626.22,4282.5) 5613.42,4295.31 ; 5613.42,4295.31 ccw(c5600.61,4308.11) 5618.72,4308.11 cw(c5600.61,4308.11) 5613.42,4295.31 ; 5613.42,4531.53 cw(c5626.22,4518.72) 5626.22,4536.83 ccw(c5626.22,4518.72) 5613.42,4531.53 ; 5613.42,4531.53 ccw(c5600.61,4544.33) 5618.72,4544.33 cw(c5600.61,4544.33) 5613.42,4531.53 ; 5731.53,3848.47 cw(c5718.72,3835.67) 5736.83,3835.67 ccw(c5718.72,3835.67) 5731.53,3848.47 ; 5731.53,3848.47 ccw(c5744.33,3861.28) 5744.33,3843.17 cw(c5744.33,3861.28) 5731.53,3848.47 ; 5731.53,3966.58 cw(c5718.72,3953.78) 5736.83,3953.78 ccw(c5718.72,3953.78) 5731.53,3966.58 ; 5731.53,3966.58 ccw(c5744.33,3979.39) 5744.33,3961.28 cw(c5744.33,3979.39) 5731.53,3966.58 ; 5731.53,4084.69 cw(c5718.72,4071.89) 5736.83,4071.89 ccw(c5718.72,4071.89) 5731.53,4084.69 ; 5731.53,4084.69 ccw(c5744.33,4097.5) 5744.33,4079.39 cw(c5744.33,4097.5) 5731.53,4084.69 ; 5731.53,4216.57 cw(c5744.33,4203.76) 5744.33,4221.87 ccw(c5744.33,4203.76) 5731.53,4216.57 ; 5731.53,4216.57 ccw(c5718.72,4229.37) 5736.83,4229.37 cw(c5718.72,4229.37) 5731.53,4216.57 ; 5731.53,4413.42 cw(c5744.33,4400.61) 5744.33,4418.72 ccw(c5744.33,4400.61) 5731.53,4413.42 ; 5731.53,4413.42 ccw(c5718.72,4426.22) 5736.83,4426.22 cw(c5718.72,4426.22) 5731.53,4413.42 ; 5731.53,4531.53 cw(c5744.33,4518.72) 5744.33,4536.83 ccw(c5744.33,4518.72) 5731.53,4531.53 ; 5731.53,4531.53 ccw(c5718.72,4544.33) 5736.83,4544.33 cw(c5718.72,4544.33) 5731.53,4531.53 ; 5737.18,3724.71 cw(c5730,3717.53) 5740.15,3717.53 ; 5737.18,3724.71 cw(c5730,3717.53) 5740.15,3717.53 ; 5737.18,3724.71 ccw(c5724.65,3712.17) 5724.65,3729.9 cw(c5724.65,3712.17) 5737.18,3724.71 ; 5737.18,3724.71 cw(c5749.71,3737.24) 5731.99,3737.24 ccw(c5749.71,3737.24) 5737.18,3724.71 ; 5737.18,4655.29 ccw(c5730,4662.47) 5740.15,4662.47 ; 5737.18,4655.29 ccw(c5730,4662.47) 5740.15,4662.47 ; 5737.18,4655.29 cw(c5724.65,4667.83) 5724.65,4650.1 ccw(c5724.65,4667.83) 5737.18,4655.29 ; 5737.18,4655.29 ccw(c5749.71,4642.76) 5731.99,4642.76 cw(c5749.71,4642.76) 5737.18,4655.29 ; 5740.15,3717.53 5740.15,3670 5740.15,3660 5740.15,3636 5740.15,3628.41 5740.15,3550.08 5740.19,3550.04 5744.12,3546.11 5749.11,3541.12 ; 5855.29,3842.82 ccw(c5862.47,3850) 5862.47,3839.85 ; 5855.29,3842.82 ccw(c5862.47,3850) 5862.47,3839.85 ; 5855.29,3842.82 cw(c5867.83,3855.35) 5850.1,3855.35 ccw(c5867.83,3855.35) 5855.29,3842.82 ; 5855.29,3842.82 ccw(c5842.76,3830.29) 5842.76,3848.01 cw(c5842.76,3830.29) 5855.29,3842.82 ; 5855.29,4537.18 cw(c5862.47,4530) 5862.47,4540.15 ; 5855.29,4537.18 cw(c5862.47,4530) 5862.47,4540.15 ; 5855.29,4537.18 ccw(c5867.83,4524.65) 5850.1,4524.65 cw(c5867.83,4524.65) 5855.29,4537.18 ; 5855.29,4537.18 cw(c5842.76,4549.71) 5842.76,4531.99 ccw(c5842.76,4549.71) 5855.29,4537.18 ; 5862.47,4540.15 5910,4540.15 5920,4540.15 5923.52,4540.15 ; 5923.52,4540.15 5924.74,4540.15 5923.52,4540.15
  Top Layer w8: v2@6616.3,1974.11 cw(c6616.3,1952.38) 6631.66,1967.75 cw(c6647.03,1983.11) v2@6625.3,1983.11 ; v2(6616.3,1983.11) U30.Y8@6635.98,1963.43 ; U30.Y8@6630.14,1963.43 ccw(c6616.04,1963.43) 6626.01,1973.4 ccw(c6635.98,1983.37) U30.Y8@6635.98,1969.27 ; v2(6655.67,1589.41) U30.W17@6675.35,1609.09 ; v2@6655.67,1598.41 ccw(c6655.67,1620.14) 6671.03,1604.77 ccw(c6686.4,1589.41) v2@6664.67,1589.41 ; v2(6655.67,1825.63) U30.W11@6675.35,1845.31 ; v2@6655.67,1834.63 ccw(c6655.67,1856.36) 6671.03,1840.99 ccw(c6686.4,1825.63) v2@6664.67,1825.63 ; v2@6655.67,2092.22 cw(c6655.67,2070.49) 6671.03,2085.86 cw(c6686.4,2101.22) v2@6664.67,2101.22 ; v2(6655.67,2101.22) U30.W5@6675.35,2081.54 ; U30.W17@6669.51,1609.09 cw(c6655.41,1609.09) 6665.38,1599.12 cw(c6675.35,1589.15) U30.W17@6675.35,1603.25 ; U30.W11@6669.51,1845.31 cw(c6655.41,1845.31) 6665.38,1835.34 cw(c6675.35,1825.37) U30.W11@6675.35,1839.47 ; U30.W5@6669.51,2081.54 ccw(c6655.41,2081.54) 6665.38,2091.51 ccw(c6675.35,2101.48) U30.W5@6675.35,2087.38 ; v2(6734.41,1707.52) U30.U14@6754.09,1727.2 ; v2@6734.41,1716.52 ccw(c6734.41,1738.25) 6749.77,1722.88 ccw(c6765.14,1707.52) v2@6743.41,1707.52 ; v2@6734.41,1974.11 cw(c6734.41,1952.38) 6749.77,1967.75 cw(c6765.14,1983.11) v2@6743.41,1983.11 ; v2(6734.41,1983.11) U30.U8@6754.09,1963.43 ; v2@6734.41,2210.33 cw(c6734.41,2188.6) 6749.77,2203.97 cw(c6765.14,2219.33) v2@6743.41,2219.33 ; v2(6734.41,2219.33) U30.U2@6754.09,2199.65 ; U30.U14@6748.25,1727.2 cw(c6734.15,1727.2) 6744.12,1717.23 cw(c6754.09,1707.26) U30.U14@6754.09,1721.36 ; U30.U8@6748.25,1963.43 ccw(c6734.15,1963.43) 6744.12,1973.4 ccw(c6754.09,1983.37) U30.U8@6754.09,1969.27 ; U30.U2@6748.25,2199.65 ccw(c6734.15,2199.65) 6744.12,2209.62 ccw(c6754.09,2219.59) U30.U2@6754.09,2205.49 ; v2(6773.78,1510.67) U30.T19@6793.46,1530.35 ; v2@6773.78,1519.67 ccw(c6773.78,1541.4) 6789.14,1526.03 ccw(c6804.51,1510.67) v2@6782.78,1510.67 ; v2@6773.78,2092.22 cw(c6773.78,2070.49) 6789.14,2085.86 cw(c6804.51,2101.22) v2@6782.78,2101.22 ; v2(6773.78,2101.22) U30.T5@6793.46,2081.54 ; U30.T19@6787.62,1530.35 cw(c6773.52,1530.35) 6783.49,1520.38 cw(c6793.46,1510.41) U30.T19@6793.46,1524.51 ; U30.T5@6787.62,2081.54 ccw(c6773.52,2081.54) 6783.49,2091.51 ccw(c6793.46,2101.48) U30.T5@6793.46,2087.38 ; v2(6813.15,1825.63) U30.R11@6832.83,1845.31 ; v2@6813.15,1834.63 ccw(c6813.15,1856.36) 6828.51,1840.99 ccw(c6843.88,1825.63) v2@6822.15,1825.63 ; U30.R11@6826.99,1845.31 cw(c6812.89,1845.31) 6822.86,1835.34 cw(c6832.83,1825.37) U30.R11@6832.83,1839.47 ; v2(6891.89,1471.3) U30.N20@6911.57,1490.98 ; v2@6891.89,1480.3 ccw(c6891.89,1502.03) 6907.25,1486.66 ccw(c6922.62,1471.3) v2@6900.89,1471.3 ; v2(6891.89,1628.78) U30.N16@6911.57,1648.46 ; v2@6891.89,1637.78 ccw(c6891.89,1659.51) 6907.25,1644.14 ccw(c6922.62,1628.78) v2@6900.89,1628.78 ; v2@6891.89,2092.22 cw(c6891.89,2070.49) 6907.25,2085.86 cw(c6922.62,2101.22) v2@6900.89,2101.22 ; v2(6891.89,2101.22) U30.N5@6911.57,2081.54 ; U30.N20@6905.73,1490.98 cw(c6891.63,1490.98) 6901.6,1481.01 cw(c6911.57,1471.04) U30.N20@6911.57,1485.14 ; U30.N16@6905.73,1648.46 cw(c6891.63,1648.46) 6901.6,1638.49 cw(c6911.57,1628.52) U30.N16@6911.57,1642.62 ; U30.N5@6905.73,2081.54 ccw(c6891.63,2081.54) 6901.6,2091.51 ccw(c6911.57,2101.48) U30.N5@6911.57,2087.38 ; v2@6970.63,1974.11 cw(c6970.63,1952.38) 6985.99,1967.75 cw(c7001.36,1983.11) v2@6979.63,1983.11 ; v2(6970.63,1983.11) U30.L8@6990.31,1963.43 ; v2@6970.63,2210.33 cw(c6970.63,2188.6) 6985.99,2203.97 cw(c7001.36,2219.33) v2@6979.63,2219.33 ; v2(6970.63,2219.33) U30.L2@6990.31,2199.65 ; U30.L8@6984.47,1963.43 ccw(c6970.37,1963.43) 6980.34,1973.4 ccw(c6990.31,1983.37) U30.L8@6990.31,1969.27 ; U30.L2@6984.47,2199.65 ccw(c6970.37,2199.65) 6980.34,2209.62 ccw(c6990.31,2219.59) U30.L2@6990.31,2205.49 ; U30.K19@7029.69,1524.51 cw(c7029.69,1510.41) 7039.66,1520.38 cw(c7049.63,1530.35) U30.K19@7035.53,1530.35 ; U30.K19@7029.69,1530.35 v2(7049.37,1510.67) ; U30.K13@7029.69,1760.73 cw(c7029.69,1746.63) 7039.66,1756.6 cw(c7049.63,1766.57) U30.K13@7035.53,1766.57 ; U30.K13@7029.69,1766.57 v2(7049.37,1746.89) ; v2@7040.37,1510.67 ccw(c7018.64,1510.67) 7034.01,1526.03 ccw(c7049.37,1541.4) v2@7049.37,1519.67 ; v2@7040.37,1746.89 ccw(c7018.64,1746.89) 7034.01,1762.25 ccw(c7049.37,1777.62) v2@7049.37,1755.89 ; U30.H16@7108.43,1642.62 cw(c7108.43,1628.52) 7118.4,1638.49 cw(c7128.37,1648.46) U30.H16@7114.27,1648.46 ; U30.H16@7108.43,1648.46 v2(7128.11,1628.78) ; U30.H5@7108.43,2081.54 v2(7128.11,2101.22) ; U30.H5@7108.43,2087.38 ccw(c7108.43,2101.48) 7118.4,2091.51 ccw(c7128.37,2081.54) U30.H5@7114.27,2081.54 ; U30.H1@7108.43,2239.02 7128.11,2258.7 ; U30.H1@7108.43,2244.86 ccw(c7108.43,2258.96) 7118.4,2248.99 ccw(c7128.37,2239.02) U30.H1@7114.27,2239.02 ; v2@7119.11,1628.78 ccw(c7097.38,1628.78) 7112.75,1644.14 ccw(c7128.11,1659.51) v2@7128.11,1637.78 ; v2@7119.11,2101.22 cw(c7097.38,2101.22) 7112.75,2085.86 cw(c7128.11,2070.49) v2@7128.11,2092.22 ; U30.F10@7187.17,1884.68 v2(7206.85,1904.37) ; U30.F10@7187.17,1890.53 ccw(c7187.17,1904.63) 7197.14,1894.66 ccw(c7207.11,1884.68) U30.F10@7193.01,1884.68 ; v2@7197.85,1904.37 cw(c7176.12,1904.37) 7191.49,1889.01 cw(c7206.85,1873.64) v2@7206.85,1895.37 ; U30.E16@7226.54,1642.62 cw(c7226.54,1628.52) 7236.51,1638.49 cw(c7246.48,1648.46) U30.E16@7232.38,1648.46 ; U30.E16@7226.54,1648.46 v2(7246.22,1628.78) ; U30.E2@7226.54,2199.65 v2(7246.22,2219.33) ; U30.E2@7226.54,2205.49 ccw(c7226.54,2219.59) 7236.51,2209.62 ccw(c7246.48,2199.65) U30.E2@7232.38,2199.65 ; v2@7237.22,1628.78 ccw(c7215.49,1628.78) 7230.86,1644.14 ccw(c7246.22,1659.51) v2@7246.22,1637.78 ; v2@7237.22,2219.33 cw(c7215.49,2219.33) 7230.86,2203.97 cw(c7246.22,2188.6) v2@7246.22,2210.33 ; U30.D19@7265.91,1524.51 cw(c7265.91,1510.41) 7275.88,1520.38 cw(c7285.85,1530.35) U30.D19@7271.75,1530.35 ; U30.D19@7265.91,1530.35 v2(7285.59,1510.67) ; U30.D13@7265.91,1760.73 cw(c7265.91,1746.63) 7275.88,1756.6 cw(c7285.85,1766.57) U30.D13@7271.75,1766.57 ; U30.D13@7265.91,1766.57 v2(7285.59,1746.89) ; U30.D7@7265.91,2002.8 v2(7285.59,2022.48) ; U30.D7@7265.91,2008.64 ccw(c7265.91,2022.74) 7275.88,2012.77 ccw(c7285.85,2002.8) U30.D7@7271.75,2002.8 ; v2@7276.59,1510.67 ccw(c7254.86,1510.67) 7270.23,1526.03 ccw(c7285.59,1541.4) v2@7285.59,1519.67 ; v2@7276.59,1746.89 ccw(c7254.86,1746.89) 7270.23,1762.25 ccw(c7285.59,1777.62) v2@7285.59,1755.89 ; v2@7276.59,2022.48 cw(c7254.86,2022.48) 7270.23,2007.12 cw(c7285.59,1991.75) v2@7285.59,2013.48 ; U30.B16@7344.65,1642.62 cw(c7344.65,1628.52) 7354.62,1638.49 cw(c7364.59,1648.46) U30.B16@7350.49,1648.46 ; U30.B16@7344.65,1648.46 v2(7364.33,1628.78) ; U30.B10@7344.65,1884.68 v2(7364.33,1904.37) ; U30.B10@7344.65,1890.53 ccw(c7344.65,1904.63) 7354.62,1894.66 ccw(c7364.59,1884.68) U30.B10@7350.49,1884.68 ; U30.B4@7344.65,2120.91 v2(7364.33,2140.59) ; U30.B4@7344.65,2126.75 ccw(c7344.65,2140.85) 7354.62,2130.88 ccw(c7364.59,2120.91) U30.B4@7350.49,2120.91 ; v2@7355.33,1628.78 ccw(c7333.6,1628.78) 7348.97,1644.14 ccw(c7364.33,1659.51) v2@7364.33,1637.78 ; v2@7355.33,1904.37 cw(c7333.6,1904.37) 7348.97,1889.01 cw(c7364.33,1873.64) v2@7364.33,1895.37 ; v2@7355.33,2140.59 cw(c7333.6,2140.59) 7348.97,2125.23 cw(c7364.33,2109.86) v2@7364.33,2131.59 ; U30.A13@7384.02,1760.73 cw(c7384.02,1746.63) 7393.99,1756.6 cw(c7403.96,1766.57) U30.A13@7389.86,1766.57 ; U30.A13@7384.02,1766.57 v2(7403.7,1746.89) ; v2@7394.7,1746.89 ccw(c7372.97,1746.89) 7388.34,1762.25 ccw(c7403.7,1777.62) v2@7403.7,1755.89 ; v2(7731.89,4445.63) U7.G5@7751.58,4465.32 ; v2@7731.89,4454.63 ccw(c7731.89,4476.36) 7747.25,4460.99 ccw(c7762.62,4445.63) v2@7740.89,4445.63 ; U7.G5@7745.58,4465.32 cw(c7731.09,4465.32) 7741.33,4455.07 cw(c7751.58,4444.83) U7.G5@7751.58,4459.32 ; v2(7771.26,4366.89) U7.F7@7790.95,4386.57 ; v2@7771.26,4375.89 ccw(c7771.26,4397.62) 7786.62,4382.25 ccw(c7801.99,4366.89) v2@7780.26,4366.89 ; v2@7771.26,4633.48 cw(c7771.26,4611.75) 7786.62,4627.12 cw(c7801.99,4642.48) v2@7780.26,4642.48 ; v2(7771.26,4642.48) U7.F1@7790.95,4622.8 ; U7.F7@7784.95,4386.57 cw(c7770.46,4386.57) 7780.7,4376.33 cw(c7790.95,4366.09) U7.F7@7790.95,4380.57 ; U7.F1@7784.95,4622.8 ccw(c7770.46,4622.8) 7780.7,4633.04 ccw(c7790.95,4643.28) U7.F1@7790.95,4628.8 ; U7.D8@7869.69,4341.2 cw(c7869.69,4326.72) 7879.93,4336.96 cw(c7890.17,4347.2) U7.D8@7875.69,4347.2 ; U7.D8@7869.69,4347.2 v2(7889.37,4327.52) ; v2@7880.37,4327.52 ccw(c7858.64,4327.52) 7874.01,4342.88 ccw(c7889.37,4358.25) v2@7889.37,4336.52